# Altium PCB CellForge_PCB.PcbDoc (part 4 of 4)
Units mm, origin at the board's own origin, x right, y up, seen from the top; angles counter-clockwise.
Board outline 170.5 x 170.5 mm, 4 copper layers (Top Layer, Solid GND Plane, Power Distribution + signals, Bottom Layer), stack 1.586 mm thick; 199 components, 117 nets, 719 pads, 464 vias.
Unrouted connection lines stored in the file: 8.
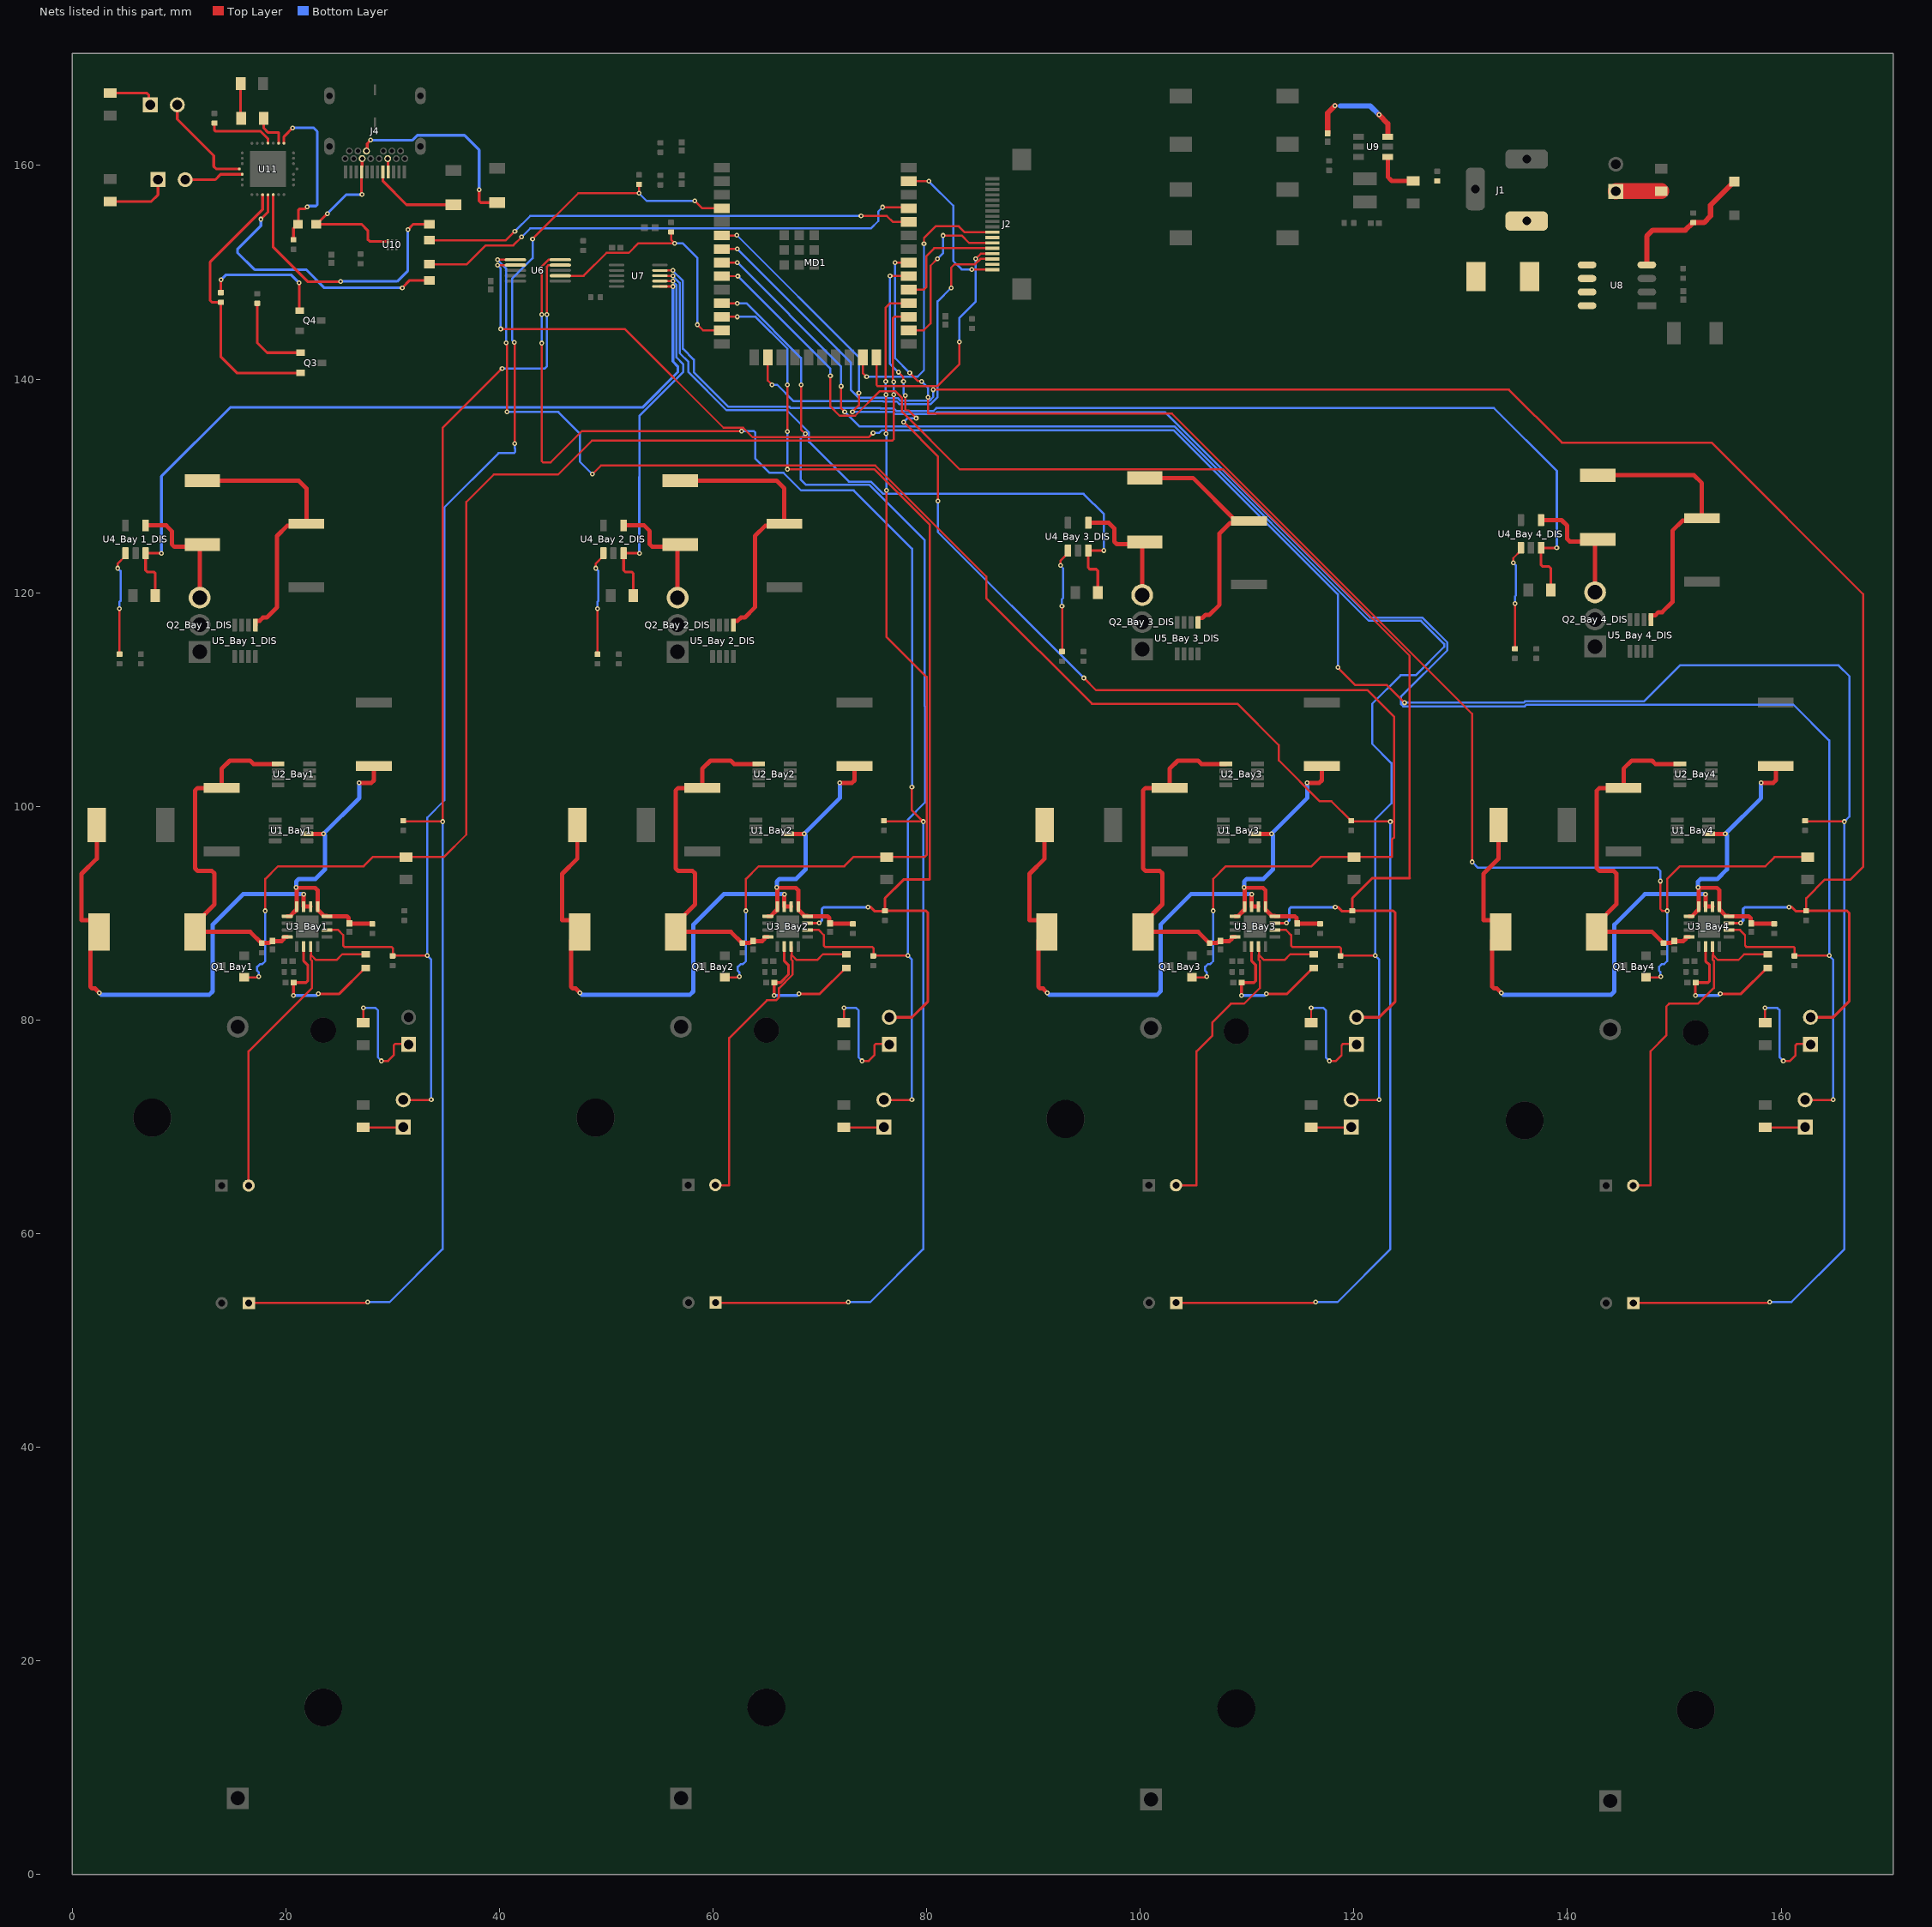
[diagram p5: the nets of this part, all layers, seen from the top]

## Via types
v1: diameter 0.45, hole 0.2, Top Layer to Bottom Layer, tented both sides, 464 vias

## Nets (pads, with @x,y where several pads share a name; then routed paths per layer and width w, separated by ;. In a path a pad name is that pad's centre, name@x,y a point inside that pad or via, vN(x,y) a via of type N, cw(c..) or ccw(c..) an arc to the next point about the centre after c; other vN are vias at no path point) (continued)
MCU_CHRG2: DS2_Bay2.2 MD1.12 R1_Bay2.2 U3_Bay2.15 | length 98.7
  Top Layer w0.2: MD1.12@60.825,145.83 v1(62.275,145.83) ; v1(66.975,131.575) 75.1,131.575 80.302,126.373 80.302,93.202 80.25,93.15 ; v1(66.975,135.1) v1(66.975,139.45)
  Top Layer w0.254: U3_Bay2.15@68.86,89.075 v1(69.95,89.075) ; v1(74.5,90.575) 74.75,90.575 75.15,90.175 76.05,90.175 R1_Bay2.2@76.1,90.225 ; DS2_Bay2.2@76.5,80.25 78.625,80.25 80.125,81.75 80.125,90.026 79.926,90.225 R1_Bay2.2@76.1,90.225 ; 80.25,93.15 77.85,93.15 76.1,91.4 R1_Bay2.2@76.1,90.225
  Bottom Layer w0.2: v1(62.275,145.83) 63.978,145.83 66.975,142.833 v1(66.975,139.45) ; v1(66.975,131.575) v1(66.975,135.1)
  Bottom Layer w0.254: v1(69.95,89.075) 70.2,89.325 70.2,90.401 70.349,90.55 74.475,90.55 v1(74.5,90.575)
MCU_CHRG3: DS2_Bay3.2 MD1.9 R1_Bay3.2 U3_Bay3.15 | length 137.3
  Top Layer w0.2: MD1.9@60.825,149.64 v1(62.325,149.64) ; v1(70.998,140.298) 70.998,137.428 71.851,136.575 73.305,136.575 75.607,138.877 77.06,138.877 77.7,138.237 77.7,136.951 83.094,131.557 107.763,131.557 125.225,114.094 125.225,93.275
  Top Layer w0.254: U3_Bay3.15@112.61,89.075 v1(113.7,89.075) ; v1(118.25,90.575) 118.5,90.575 118.9,90.175 119.8,90.175 R1_Bay3.2@119.85,90.225 ; DS2_Bay3.2@120.25,80.25 122.375,80.25 123.875,81.75 123.875,90.026 123.676,90.225 R1_Bay3.2@119.85,90.225 ; 125.225,93.275 121.725,93.275 119.85,91.4 R1_Bay3.2@119.85,90.225
  Bottom Layer w0.2: v1(62.325,149.64) 70.998,140.967 v1(70.998,140.298)
  Bottom Layer w0.254: v1(113.7,89.075) 113.95,89.325 113.95,90.401 114.099,90.55 118.225,90.55 v1(118.25,90.575)
MCU_CHRG4: DS2_Bay4.2 MD1.7 R1_Bay4.2 U3_Bay4.15 | length 181.5
  Top Layer w0.2: MD1.7@60.825,152.18 v1(62.275,152.18) ; v1(80.625,139.003) 134.522,139.003 139.475,134.05 153.5,134.05 167.675,119.875 167.675,94.325 166.5,93.15 164.1,93.15 162.35,91.4 R1_Bay4.2@162.35,90.225
  Top Layer w0.254: U3_Bay4.15@155.11,89.075 v1(156.2,89.075) ; v1(160.75,90.575) 161,90.575 161.4,90.175 162.3,90.175 R1_Bay4.2@162.35,90.225 166.176,90.225 166.375,90.026 166.375,81.75 164.875,80.25 DS2_Bay4.2@162.75,80.25
  Bottom Layer w0.2: v1(62.275,152.18) 72.898,141.557 72.898,138.99 73.619,138.269 76.019,138.269 76.065,138.223 77.307,138.223 77.557,137.973 80.26,137.973 80.625,138.338 v1(80.625,139.003)
  Bottom Layer w0.254: v1(156.2,89.075) 156.45,89.325 156.45,90.401 156.599,90.55 160.725,90.55 v1(160.75,90.575)
MCU_MODE_EN1: MD1.27 Q1_Bay1.1 R3_Bay1.1 | length 118.1
  Top Layer w0.2: Q1_Bay1.1@16.1,84 17.41,84 17.46,84.05 v1(17.475,84.05) ; v1(18.075,90.225) 18.075,93.2 19.273,94.398 27.285,94.398 28.137,95.25 R3_Bay1.1@31.25,95.25 34.8,95.25 36.9,97.35 36.9,128.5 39.475,131.075 45.5,131.075 48.673,134.248 76.781,134.248 76.925,134.392 v1(76.925,138.55) ; v1(76.925,139.75) 76.925,139.765 76.85,139.84 76.85,145.713 76.967,145.83 MD1.27@78.325,145.83
  Bottom Layer w0.2: v1(17.475,84.05) 17.465,84.06 17.465,84.475 17.325,84.615 17.325,84.975 17.595,85.245 17.807,85.245 18.077,85.515 18.077,90.223 v1(18.075,90.225) ; v1(76.925,138.55) v1(76.925,139.75)
MCU_MODE_EN2: MD1.28 Q1_Bay2.1 R3_Bay2.1 | length 84.1
  Top Layer w0.2: Q1_Bay2.1@61.1,84 62.41,84 62.46,84.05 v1(62.475,84.05) ; v1(63.075,90.225) 63.075,93.2 64.273,94.398 72.285,94.398 73.137,95.25 79.8,95.25 80.002,95.452 80.002,112.111 76.225,115.888 v1(76.225,129.575) ; v1(76.175,139.775) 76.175,146.7 76.575,147.1 MD1.28@78.325,147.1 ; v1(76.2,134.9) v1(76.2,138.55)
  Bottom Layer w0.2: v1(62.475,84.05) 62.465,84.06 62.465,84.475 62.325,84.615 62.325,84.975 62.595,85.245 62.807,85.245 63.077,85.515 63.077,90.223 v1(63.075,90.225) ; v1(76.175,139.775) 76.175,138.59 76.2,138.565 v1(76.2,138.55) ; v1(76.2,134.9) 76.2,134.885 76.225,134.86 v1(76.225,129.575)
MCU_MODE_EN3: MD1.30 Q1_Bay3.1 R3_Bay3.1 | length 120.9
  Top Layer w0.2: v1(76.575,149.65) 78.315,149.65 MD1.30@78.325,149.64 ; v1(77.35,140.65) 77.815,140.185 77.815,139.785 v1(77.825,139.775) ; v1(77.85,135.975) 81.05,132.775 v1(81.05,128.6) ; v1(78,138.45) 78,137.075 78.3,137.075 v1(79.025,136.35) ; v1(94.723,112.023) 95.871,110.875 121.286,110.875 123.752,108.409 123.752,97.081 123.55,96.879 123.55,95.25 116.887,95.25 116.035,94.398 108.023,94.398 106.825,93.2 v1(106.825,90.225) ; Q1_Bay3.1@104.85,84 106.16,84 106.21,84.05 v1(106.225,84.05)
  Bottom Layer w0.2: v1(76.575,149.65) 76.575,141.425 v1(77.35,140.65) ; v1(77.825,139.775) 77.825,138.64 78,138.465 v1(78,138.45) ; v1(77.85,135.975) 78.225,136.35 v1(79.025,136.35) ; v1(81.05,128.6) 81.05,125.696 v1(94.723,112.023) ; v1(106.225,84.05) 106.215,84.06 106.215,84.475 106.075,84.615 106.075,84.975 106.345,85.245 106.557,85.245 106.827,85.515 106.827,90.223 v1(106.825,90.225)
MCU_MODE_EN4: MD1.31 Q1_Bay4.1 R3_Bay4.1 | length 140.6
  Top Layer w0.2: v1(77.05,150.9) 78.315,150.9 MD1.31@78.325,150.91 ; v1(78.425,140.575) 79.19,139.81 79.515,139.81 v1(79.525,139.8) ; v1(80.125,138.3) 80.125,136.775 102.969,136.775 131.075,108.669 v1(131.075,94.8) ; Q1_Bay4.1@147.35,84 148.66,84 148.71,84.05 v1(148.725,84.05) ; v1(148.7,93) 148.7,90.4 148.875,90.225 v1(149.325,90.225) 149.325,93.2 150.523,94.398 158.535,94.398 159.387,95.25 R3_Bay4.1@162.5,95.25
  Bottom Layer w0.2: v1(77.05,150.9) 77.05,141.95 v1(78.425,140.575) ; v1(79.525,139.8) 80.125,139.2 v1(80.125,138.3) ; v1(131.075,94.8) 131.625,94.25 148.408,94.25 148.7,93.958 v1(148.7,93) ; v1(148.725,84.05) 148.715,84.06 148.715,84.475 148.575,84.615 148.575,84.975 148.845,85.245 149.057,85.245 149.327,85.515 149.327,90.223 v1(149.325,90.225)
MCU_STBY1: DS1_Bay1.2 MD1.4 R2_Bay1.2 R12.2 U3_Bay1.14 | length 120.9
  Top Layer w0.2: U3_Bay1.14@23.86,88.425 24.9,88.425 25.375,87.95 25.375,86.967 25.492,86.85 29.908,86.85 30.025,86.733 30.025,86.025 R2_Bay1.2@30,86 30.015,86.015 33.24,86.015 v1(33.25,86.025) ; DS1_Bay1.2@31,72.52 33.58,72.52 33.61,72.55 v1(33.625,72.55) ; v1(41.4,143.425) 41.4,143.41 41.425,143.385 v1(41.425,133.95) ; v1(43.1,153.125) 47.375,157.4 v1(53.075,157.4) R12.2@53.075,158.225 ; v1(58.3,156.675) 58.985,155.99 MD1.4@60.825,155.99
  Bottom Layer w0.2: v1(33.625,72.55) 33.625,85.65 v1(33.25,86.025) 33.25,98.962 34.85,100.562 34.85,128 39.925,133.075 41.358,133.075 41.475,133.192 41.475,133.485 41.435,133.525 41.435,133.94 v1(41.425,133.95) ; v1(41.4,143.425) 41.4,143.44 41.173,143.667 41.173,149.386 43.1,151.313 v1(43.1,153.125) ; v1(53.075,157.4) 53.8,156.675 v1(58.3,156.675)
MCU_STBY2: DS1_Bay2.2 MD1.11 R2_Bay2.2 U3_Bay2.14 | length 102.5
  Top Layer w0.2: MD1.11@60.825,147.1 v1(62.275,147.1) ; v1(68.245,139.45) 68.245,135.28 v1(68.65,134.875) ; U3_Bay2.14@68.86,88.425 69.9,88.425 70.375,87.95 70.375,86.967 70.492,86.85 74.908,86.85 75.025,86.733 75.025,86.025 R2_Bay2.2@75,86 75.015,86.015 78.24,86.015 v1(78.25,86.025) ; DS1_Bay2.2@76,72.52 78.58,72.52 78.61,72.55 v1(78.625,72.55)
  Bottom Layer w0.2: v1(62.275,147.1) 63.133,147.1 68.245,141.988 v1(68.245,139.45) ; v1(68.65,134.875) 68.2,134.425 68.2,130.6 68.7,130.1 74.65,130.1 79.825,124.925 79.825,109.4 79.85,109.375 79.85,100.37 78.25,98.77 v1(78.25,86.025) 78.625,85.65 v1(78.625,72.55)
MCU_STBY3: DS1_Bay3.2 MD1.8 R2_Bay3.2 U3_Bay3.14 | length 146.6
  Top Layer w0.2: MD1.8@60.825,150.91 v1(62.275,150.91) ; v1(72,139.325) 72,137.275 v1(72.325,136.95) ; U3_Bay3.14@112.61,88.425 113.65,88.425 114.125,87.95 114.125,86.967 114.242,86.85 118.658,86.85 118.775,86.733 118.775,86.025 R2_Bay3.2@118.75,86 ; R2_Bay3.2@118.765,86.015 121.99,86.015 v1(122,86.025) ; DS1_Bay3.2@119.75,72.52 122.33,72.52 122.36,72.55 v1(122.375,72.55)
  Bottom Layer w0.2: v1(62.275,150.91) 72,141.185 v1(72,139.325) ; v1(72.325,136.95) 73.722,135.553 103.225,135.553 121.398,117.381 126.282,117.381 128.452,115.21 128.452,114.94 125.787,112.275 124.388,112.275 121.723,109.61 121.723,105.846 123.517,104.052 123.517,100.287 122,98.77 v1(122,86.025) 122.375,85.65 v1(122.375,72.55)
MCU_STBY4: DS1_Bay4.2 MD1.6 R2_Bay4.2 U3_Bay4.14 | length 184.8
  Top Layer w0.2: MD1.6@60.825,153.45 62.185,153.45 62.21,153.475 v1(62.225,153.475) ; v1(73.05,136.95) 73.65,137.55 v1(73.65,138.7) ; U3_Bay4.14@155.11,88.425 156.15,88.425 156.625,87.95 156.625,86.967 156.742,86.85 161.158,86.85 161.275,86.733 161.275,86.025 R2_Bay4.2@161.25,86 161.265,86.015 164.49,86.015 v1(164.5,86.025) ; DS1_Bay4.2@162.25,72.52 164.83,72.52 164.86,72.55 v1(164.875,72.55)
  Bottom Layer w0.2: v1(62.225,153.475) 73.65,142.05 v1(73.65,138.7) ; v1(73.05,136.95) 76.807,136.95 77.038,136.719 80.78,136.719 80.961,136.9 102.303,136.9 121.522,117.681 126.406,117.681 128.752,115.335 128.752,114.614 124.423,110.285 124.423,109.565 124.615,109.373 135.992,109.373 136.148,109.529 161.144,109.529 164.5,106.173 v1(164.5,86.025) 164.875,85.65 v1(164.875,72.55)
NetC1_Bay1_1: C1_Bay1.1 C2_Bay1.1 R_SHUNT1_Bay1.2 U1_Bay1.2 U3_Bay1.1 U3_Bay1.4 U3_Bay1.5 U3_Bay1.16 | length 30.8
  Top Layer w0.4: U3_Bay1.5@20.14,89.725 20.405,89.725 20.985,90.305 21.025,90.345 U3_Bay1.4@21.025,90.61 21.025,92.35 v1(20.975,92.4) 21,92.375 22.741,92.375 22.975,92.141 U3_Bay1.1@22.975,90.61 22.975,90.345 23.555,89.765 23.82,89.765 U3_Bay1.16@23.86,89.725 25.716,89.725 25.88,89.561 25.88,89.11 C2_Bay1.1@25.95,89.04 25.97,89.02 28.08,89.02 C1_Bay1.1@28.1,89 ; U1_Bay1.2@21.975,97.425 23.4,97.425 v1(23.525,97.425) ; v1(26.875,102.225) 26.9,102.2 28.016,102.2 28.25,102.434 R_SHUNT1_Bay1.2@28.25,103.778
  Bottom Layer w0.4: v1(20.975,92.4) 20.975,92.966 21.209,93.2 22.775,93.2 23.675,94.1 23.675,97.275 v1(23.525,97.425) 26.875,100.775 v1(26.875,102.225)
NetC1_Bay2_1: C1_Bay2.1 C2_Bay2.1 R_SHUNT1_Bay2.2 U1_Bay2.2 U3_Bay2.1 U3_Bay2.4 U3_Bay2.5 U3_Bay2.16 | length 30.8
  Top Layer w0.4: U3_Bay2.5@65.14,89.725 65.405,89.725 65.985,90.305 66.025,90.345 U3_Bay2.4@66.025,90.61 66.025,92.35 v1(65.975,92.4) 66,92.375 67.741,92.375 67.975,92.141 U3_Bay2.1@67.975,90.61 67.975,90.345 68.555,89.765 68.82,89.765 U3_Bay2.16@68.86,89.725 70.716,89.725 70.88,89.561 70.88,89.11 C2_Bay2.1@70.95,89.04 70.97,89.02 73.08,89.02 C1_Bay2.1@73.1,89 ; U1_Bay2.2@66.975,97.425 68.4,97.425 v1(68.525,97.425) ; v1(71.875,102.225) 71.9,102.2 73.016,102.2 73.25,102.434 R_SHUNT1_Bay2.2@73.25,103.778
  Bottom Layer w0.4: v1(65.975,92.4) 65.975,92.966 66.209,93.2 67.775,93.2 68.675,94.1 68.675,97.275 v1(68.525,97.425) 71.875,100.775 v1(71.875,102.225)
NetC1_Bay3_1: C1_Bay3.1 C2_Bay3.1 R_SHUNT1_Bay3.2 U1_Bay3.2 U3_Bay3.1 U3_Bay3.4 U3_Bay3.5 U3_Bay3.16 | length 30.8
  Top Layer w0.4: U3_Bay3.5@108.89,89.725 109.155,89.725 109.735,90.305 109.775,90.345 U3_Bay3.4@109.775,90.61 109.775,92.35 v1(109.725,92.4) 109.75,92.375 111.491,92.375 111.725,92.141 U3_Bay3.1@111.725,90.61 111.725,90.345 112.305,89.765 112.57,89.765 U3_Bay3.16@112.61,89.725 114.466,89.725 114.63,89.561 114.63,89.11 C2_Bay3.1@114.7,89.04 114.72,89.02 116.83,89.02 C1_Bay3.1@116.85,89 ; U1_Bay3.2@110.725,97.425 112.15,97.425 v1(112.275,97.425) ; v1(115.625,102.225) 115.65,102.2 116.766,102.2 117,102.434 R_SHUNT1_Bay3.2@117,103.778
  Bottom Layer w0.4: v1(109.725,92.4) 109.725,92.966 109.959,93.2 111.525,93.2 112.425,94.1 112.425,97.275 v1(112.275,97.425) 115.625,100.775 v1(115.625,102.225)
NetC1_Bay4_1: C1_Bay4.1 C2_Bay4.1 R_SHUNT1_Bay4.2 U1_Bay4.2 U3_Bay4.1 U3_Bay4.4 U3_Bay4.5 U3_Bay4.16 | length 30.8
  Top Layer w0.4: U3_Bay4.5@151.39,89.725 151.655,89.725 152.235,90.305 152.275,90.345 U3_Bay4.4@152.275,90.61 152.275,92.35 v1(152.225,92.4) 152.25,92.375 153.991,92.375 154.225,92.141 154.225,90.61 154.225,90.345 154.805,89.765 155.07,89.765 U3_Bay4.16@155.11,89.725 156.966,89.725 157.13,89.561 157.13,89.11 C2_Bay4.1@157.2,89.04 157.22,89.02 159.33,89.02 C1_Bay4.1@159.35,89 ; U1_Bay4.2@153.225,97.425 154.65,97.425 v1(154.775,97.425) ; v1(158.125,102.225) 158.15,102.2 159.266,102.2 159.5,102.434 R_SHUNT1_Bay4.2@159.5,103.778
  Bottom Layer w0.4: v1(152.225,92.4) 152.225,92.966 152.459,93.2 154.025,93.2 154.925,94.1 154.925,97.275 v1(154.775,97.425) 158.125,100.775 v1(158.125,102.225)
NetC7_Bay1_1: C7_Bay1.1 R8_Bay1.1 U3_Bay1.10 | length 13.8
  Top Layer w0.254: v1(20.725,82.3) 20.725,83.475 C7_Bay1.1@20.75,83.5 21.901,83.5 22.052,83.651 22.052,85.147 21.675,85.524 U3_Bay1.10@21.675,86.89 ; v1(23.05,82.45) 25,82.45 27.4,84.85 R8_Bay1.1@27.5,84.85
  Bottom Layer w0.254: v1(20.725,82.3) 22.9,82.3 v1(23.05,82.45)
NetC7_Bay2_1: C7_Bay2.1 R8_Bay2.1 U3_Bay2.10 | length 13.5
  Top Layer w0.254: v1(65.725,82.3) 65.725,83.475 C7_Bay2.1@65.75,83.5 66.308,83.5 67.052,84.244 67.052,85.147 66.675,85.524 U3_Bay2.10@66.675,86.89 ; v1(68.05,82.45) 70,82.45 72.4,84.85 R8_Bay2.1@72.5,84.85
  Bottom Layer w0.254: v1(65.725,82.3) 67.9,82.3 v1(68.05,82.45)
NetC7_Bay3_1: C7_Bay3.1 R8_Bay3.1 U3_Bay3.10 | length 13.8
  Top Layer w0.254: v1(109.475,82.3) 109.475,83.475 C7_Bay3.1@109.5,83.5 110.651,83.5 110.802,83.651 110.802,85.147 110.425,85.524 U3_Bay3.10@110.425,86.89 ; v1(111.8,82.45) 113.75,82.45 116.15,84.85 R8_Bay3.1@116.25,84.85
  Bottom Layer w0.254: v1(109.475,82.3) 111.65,82.3 v1(111.8,82.45)
NetC7_Bay4_1: C7_Bay4.1 R8_Bay4.1 U3_Bay4.10 | length 13.8
  Top Layer w0.254: v1(151.975,82.3) 151.975,83.475 C7_Bay4.1@152,83.5 153.151,83.5 153.302,83.651 153.302,85.147 152.925,85.524 U3_Bay4.10@152.925,86.89 ; v1(154.3,82.45) 156.25,82.45 158.65,84.85 R8_Bay4.1@158.75,84.85
  Bottom Layer w0.254: v1(151.975,82.3) 154.15,82.3 v1(154.3,82.45)
NetC14_1: C14.1 U9.6 | length 9.2
  Top Layer w0.5: C14.1@117.55,163.005 117.55,164.915 v1(118.225,165.59) ; v1(122.35,164.75) 123.175,163.925 U9.6@123.175,162.7
  Bottom Layer w0.5: 118.725,165.575 121.525,165.575 v1(122.35,164.75)
NetD1_Bay1_1: D1_Bay1.1 L1_Bay1.1 U3_Bay1.2 U3_Bay1.3 | length 46.9
  Top Layer w0.4: D1_Bay1.1@2.295,98.25 2.295,95.095 0.875,93.675 0.875,89.35 1.7,89.35 2.5,88.55 L1_Bay1.1@2.5,88.25 1.7,87.45 1.7,86.424 1.7,83.126 1.876,82.95 2.15,82.95 v1(2.55,82.55) ; v1(21.675,91.775) U3_Bay1.3@21.675,90.61 U3_Bay1.2@22.325,90.61
  Bottom Layer w0.4: v1(2.55,82.55) 2.725,82.375 12.85,82.375 13.15,82.675 13.15,88.925 16,91.775 v1(21.675,91.775)
NetD1_Bay2_1: D1_Bay2.1 L1_Bay2.1 U3_Bay2.2 U3_Bay2.3 | length 46.9
  Top Layer w0.4: D1_Bay2.1@47.295,98.25 47.295,95.095 45.875,93.675 45.875,89.35 46.7,89.35 47.5,88.55 L1_Bay2.1@47.5,88.25 46.7,87.45 46.7,86.424 46.7,83.126 46.876,82.95 47.15,82.95 v1(47.55,82.55) ; v1(66.675,91.775) U3_Bay2.3@66.675,90.61 U3_Bay2.2@67.325,90.61
  Bottom Layer w0.4: v1(47.55,82.55) 47.725,82.375 57.85,82.375 58.15,82.675 58.15,88.925 61,91.775 v1(66.675,91.775)
NetD1_Bay3_1: D1_Bay3.1 L1_Bay3.1 U3_Bay3.2 U3_Bay3.3 | length 46.9
  Top Layer w0.4: D1_Bay3.1@91.045,98.25 91.045,95.095 89.625,93.675 89.625,89.35 90.45,89.35 91.25,88.55 L1_Bay3.1@91.25,88.25 90.45,87.45 90.45,86.424 90.45,83.126 90.626,82.95 90.9,82.95 v1(91.3,82.55) ; v1(110.425,91.775) U3_Bay3.3@110.425,90.61 U3_Bay3.2@111.075,90.61
  Bottom Layer w0.4: v1(91.3,82.55) 91.475,82.375 101.6,82.375 101.9,82.675 101.9,88.925 104.75,91.775 v1(110.425,91.775)
NetD1_Bay4_1: D1_Bay4.1 L1_Bay4.1 U3_Bay4.2 U3_Bay4.3 | length 46.9
  Top Layer w0.4: D1_Bay4.1@133.545,98.25 133.545,95.095 132.125,93.675 132.125,89.35 132.95,89.35 133.75,88.55 L1_Bay4.1@133.75,88.25 132.95,87.45 132.95,86.424 132.95,83.126 133.126,82.95 133.4,82.95 v1(133.8,82.55) ; v1(152.925,91.775) U3_Bay4.3@152.925,90.61 U3_Bay4.2@153.575,90.61
  Bottom Layer w0.4: v1(133.8,82.55) 133.975,82.375 144.1,82.375 144.4,82.675 144.4,88.925 147.25,91.775 v1(152.925,91.775)
NetD3_2: D3.2 R25.1 U8.4 | length 13.6
  Top Layer w0.5: U8.4@147.425,150.69 147.425,153.382 147.986,153.943 151.043,153.943 151.75,154.65 R25.1@151.775,154.65 152.775,154.65 153.4,155.275 153.4,156.275 155.4,158.275 155.4,158.3 155.6,158.5 D3.2@155.625,158.5
NetDS1_Bay1_1: DS1_Bay1.1 R4_Bay1.2 | length 3.8
  Top Layer w0.2: R4_Bay1.2@27.25,69.95 30.97,69.95 DS1_Bay1.1@31,69.98
NetDS1_Bay2_1: DS1_Bay2.1 R4_Bay2.2 | length 3.8
  Top Layer w0.2: R4_Bay2.2@72.25,69.95 75.97,69.95 DS1_Bay2.1@76,69.98
NetDS1_Bay3_1: DS1_Bay3.1 R4_Bay3.2 | length 3.8
  Top Layer w0.2: R4_Bay3.2@116,69.95 119.72,69.95 DS1_Bay3.1@119.75,69.98
NetDS1_Bay4_1: DS1_Bay4.1 R4_Bay4.2 | length 3.8
  Top Layer w0.2: R4_Bay4.2@158.5,69.95 162.22,69.95 DS1_Bay4.1@162.25,69.98
NetDS2_Bay1_1: DS2_Bay1.1 R5_Bay1.2 | length 11.5
  Top Layer w0.2: R5_Bay1.2@27.25,79.75 v1(27.25,81.125) ; v1(28.95,76.175) 29.575,76.175 30.1,76.7 30.1,77.633 30.217,77.75 31.46,77.75 DS2_Bay1.1@31.5,77.71
  Bottom Layer w0.2: v1(27.25,81.125) 28.4,81.125 28.625,80.9 28.625,76.5 v1(28.95,76.175)
NetDS2_Bay2_1: DS2_Bay2.1 R5_Bay2.2 | length 11.5
  Top Layer w0.2: R5_Bay2.2@72.25,79.75 v1(72.25,81.125) ; v1(73.95,76.175) 74.575,76.175 75.1,76.7 75.1,77.633 75.217,77.75 76.46,77.75 DS2_Bay2.1@76.5,77.71
  Bottom Layer w0.2: v1(72.25,81.125) 73.4,81.125 73.625,80.9 73.625,76.5 v1(73.95,76.175)
NetDS2_Bay3_1: DS2_Bay3.1 R5_Bay3.2 | length 11.5
  Top Layer w0.2: R5_Bay3.2@116,79.75 v1(116,81.125) ; v1(117.7,76.175) 118.325,76.175 118.85,76.7 118.85,77.633 118.967,77.75 120.21,77.75 DS2_Bay3.1@120.25,77.71
  Bottom Layer w0.2: v1(116,81.125) 117.15,81.125 117.375,80.9 117.375,76.5 v1(117.7,76.175)
NetDS2_Bay4_1: DS2_Bay4.1 R5_Bay4.2 | length 11.5
  Top Layer w0.2: R5_Bay4.2@158.5,79.75 v1(158.5,81.125) ; v1(160.2,76.175) 160.825,76.175 161.35,76.7 161.35,77.633 161.467,77.75 162.71,77.75 DS2_Bay4.1@162.75,77.71
  Bottom Layer w0.2: v1(158.5,81.125) 159.65,81.125 159.875,80.9 159.875,76.5 v1(160.2,76.175)
NetDS3_1: DS3.1 R23.2 | length 4.3
  Top Layer w1.5: DS3.1@144.525,157.58 144.545,157.6 R23.2@148.775,157.6
NetDS5_1: DS5.1 R30.2 | length 4.7
  Top Layer w0.254: R30.2@3.575,166.775 7,166.775 7.175,166.6 7.175,165.805 DS5.1@7.305,165.675
NetDS5_2: DS5.2 U11.18 | length 9.7
  Top Layer w0.254: DS5.2@9.845,165.675 9.845,164.33 13.25,160.925 13.25,159.904 13.479,159.675 U11.18@15.65,159.675
NetDS6_1: DS6.1 R31.2 | length 6.1
  Top Layer w0.254: R31.2@3.575,156.625 7.4,156.625 8.035,157.26 DS6.1@8.035,158.675
NetDS6_2: DS6.2 U11.19 | length 5.6
  Top Layer w0.254: DS6.2@10.575,158.675 13.4,158.675 13.9,159.175 U11.19@15.925,159.175
NetF1_1: F1.1 J1.1
NetF1_2: F1.2 U8.5 U8.6 U8.7 U8.8
NetJ2_1: J2.1 MD1.37 | length 14.3
  Top Layer w0.2: MD1.37@78.325,158.53 78.33,158.525 v1(80.2,158.525) ; v1(84.225,150.275) 84.235,150.265 86.135,150.265 J2.1@86.15,150.25
  Bottom Layer w0.2: v1(80.2,158.525) 82.5,156.225 82.5,151.05 83.275,150.275 v1(84.225,150.275)
NetJ2_3: J2.3 MD1.16 | length 36.1
  Top Layer w0.2: MD1.16@65.135,142.04 65.135,139.865 v1(65.525,139.475) ; v1(82.3,148.55) 82.3,150.433 82.617,150.75 84.537,150.75 85.037,151.25 J2.3@86.15,151.25
  Bottom Layer w0.2: v1(65.525,139.475) 66,139.475 67.544,137.931 75.932,137.931 75.959,137.904 77.202,137.904 77.433,137.673 80.385,137.673 81.025,138.313 81.025,147.275 v1(82.3,148.55)
NetJ2_4: J2.4 MD1.24 | length 23.5
  Top Layer w0.2: MD1.24@75.295,142.04 75.295,139.467 75.412,139.35 81.025,139.35 83.075,141.4 v1(83.075,143.475) ; v1(84.6,151.275) 85.075,151.75 J2.4@86.15,151.75
  Bottom Layer w0.2: v1(83.075,143.475) 83.075,145.738 84.6,147.263 v1(84.6,151.275)
NetJ2_5: J2.5 MD1.29 | length 11.1
  Top Layer w0.2: MD1.29@78.325,148.37 79.72,148.37 79.975,148.625 79.975,151.525 80.7,152.25 J2.5@86.15,152.25
NetJ2_6: J2.6 MD1.26 | length 15.9
  Top Layer w0.2: MD1.26@78.325,144.56 79.715,144.56 80.375,145.22 80.375,150.625 v1(81.025,151.275) ; v1(81.525,153.45) 83.275,153.45 83.975,152.75 J2.6@86.15,152.75
  Bottom Layer w0.2: v1(81.025,151.275) 81.525,151.775 v1(81.525,153.45)
NetJ2_8: J2.8 MD1.23 | length 27
  Top Layer w0.2: MD1.23@74.025,142.04 74.025,140.575 v1(74.375,140.225) ; v1(79.75,152.675) 79.75,153.2 80.85,154.3 83.012,154.3 83.562,153.75 J2.8@86.15,153.75
  Bottom Layer w0.2: v1(74.375,140.225) 79.15,140.225 79.75,140.825 v1(79.75,152.675)
NetJ4_A5: J4.A5 R32.2 | length 8.4
  Top Layer w0.254: J4.A5@29.095,159.395 29.095,158.53 31.3,156.325 R32.2@35.7,156.325
NetJ4_B5: J4.B5 R33.2 | length 18.6
  Top Layer w0.254: J4.B5@27.545,161.345 27.621,161.421 27.621,162.046 v1(27.95,162.375) ; v1(38.1,157.725) 38.1,156.675 38.25,156.525 R33.2@39.775,156.525
  Bottom Layer w0.254: v1(27.95,162.375) 31.867,162.375 32.314,162.822 36.728,162.822 38.1,161.45 v1(38.1,157.725)
"NetQ2_Bay 1_DIS_3": "Q2_Bay 1_DIS.3" "R15_Bay 1_DIS.1" "U4_Bay 1_DIS.4" | length 12
  Top Layer w0.4: 6.881,126.3 8.8,126.3 9.325,125.775 9.325,124.534 9.559,124.3 11.978,124.3 12.181,124.503 11.931,124.253 11.931,119.54
"NetQ2_Bay 2_DIS_3": "Q2_Bay 2_DIS.3" "R15_Bay 2_DIS.1" "U4_Bay 2_DIS.4" | length 12
  Top Layer w0.4: 51.631,126.3 53.55,126.3 54.075,125.775 54.075,124.534 54.309,124.3 56.728,124.3 56.931,124.503 56.681,124.253 56.681,119.54
"NetQ2_Bay 3_DIS_3": "Q2_Bay 3_DIS.3" "R15_Bay 3_DIS.1" "U4_Bay 3_DIS.4" | length 12
  Top Layer w0.4: 95.131,126.55 97.05,126.55 97.575,126.025 97.575,124.784 97.809,124.55 100.228,124.55 100.431,124.753 100.181,124.503 100.181,119.79
"NetQ2_Bay 4_DIS_3": "Q2_Bay 4_DIS.3" "R15_Bay 4_DIS.1" "U4_Bay 4_DIS.4" | length 12
  Top Layer w0.4: 137.531,126.8 139.45,126.8 139.975,126.275 139.975,125.034 140.209,124.8 142.628,124.8 142.831,125.003 142.581,124.753 142.581,120.04
NetQ3_1: Q3.1 R28.2 | length 8.1
  Top Layer w0.254: R28.2@17.325,147.1 17.325,143.4 18.25,142.475 Q3.1@21.365,142.475
NetQ4_1: Q4.1 R29.2 | length 11.6
  Top Layer w0.254: R29.2@13.925,148.1 v1(13.925,149.3) ; v1(21.25,149.025) 21.25,146.465 Q4.1@21.29,146.425
  Bottom Layer w0.254: v1(13.925,149.3) 14.375,149.75 20.525,149.75 v1(21.25,149.025)
NetR7_Bay1_2: R7_Bay1.2 R8_Bay1.2 U3_Bay1.11 | length 30.5
  Top Layer w0.2: R7_Bay1.2@16.52,64.5 16.52,77.07 22.45,83 22.45,85.535 22.325,85.66 22.325,86.085 ; U3_Bay1.11@22.325,86.89 22.365,86.85 22.365,86.085 22.827,85.623 24.756,85.623 25.283,86.15 R8_Bay1.2@27.5,86.15
NetR7_Bay2_2: R7_Bay2.2 R8_Bay2.2 U3_Bay2.11 | length 32.3
  Top Layer w0.2: R7_Bay2.2@60.22,64.55 60.27,64.5 61.52,64.5 61.52,78.32 65.05,81.85 65.911,81.85 66.175,82.114 66.175,82.975 67.45,84.25 67.45,85.535 67.325,85.66 67.325,86.085 ; U3_Bay2.11@67.325,86.89 67.365,86.85 67.365,86.085 67.827,85.623 69.756,85.623 70.283,86.15 R8_Bay2.2@72.5,86.15
NetR7_Bay3_2: R7_Bay3.2 R8_Bay3.2 U3_Bay3.11 | length 33.1
  Top Layer w0.2: R7_Bay3.2@103.345,64.525 103.37,64.5 105.27,64.5 105.27,77.07 106.753,78.553 106.753,79.778 108.493,81.518 109.718,81.518 111.2,83 111.2,85.535 111.075,85.66 111.075,86.085 ; U3_Bay3.11@111.075,86.89 111.115,86.85 111.115,86.085 111.577,85.623 113.506,85.623 114.033,86.15 R8_Bay3.2@116.25,86.15
NetR7_Bay4_2: R7_Bay4.2 R8_Bay4.2 U3_Bay4.11 | length 33.7
  Top Layer w0.2: R7_Bay4.2@146.145,64.5 147.77,64.5 147.77,77.07 149.253,78.553 149.253,81.253 149.518,81.518 152.217,81.518 153.7,83 153.7,85.535 153.575,85.66 153.575,86.085 ; U3_Bay4.11@153.575,86.89 153.615,86.85 153.615,86.085 154.077,85.623 156.006,85.623 156.533,86.15 R8_Bay4.2@158.75,86.15
"NetR15_Bay 1_DIS_2": "R15_Bay 1_DIS.2" "R17_Bay 1_DIS.1" "U5_Bay 1_DIS.1" | length 26.2
  Top Layer w0.4: 12.181,130.497 21.203,130.497 21.931,129.769 21.931,126.472 21.723,126.264 20.131,126.264 19.173,125.306 19.173,118.632 18.216,117.675 17.856,117.675 17.556,117.375 17.181,117.375 17.156,117.35 17.156,116.975
"NetR15_Bay 2_DIS_2": "R15_Bay 2_DIS.2" "R17_Bay 2_DIS.1" "U5_Bay 2_DIS.1" | length 26.2
  Top Layer w0.4: 56.931,130.497 65.953,130.497 66.681,129.769 66.681,126.472 66.473,126.264 64.881,126.264 63.923,125.306 63.923,118.632 62.966,117.675 62.606,117.675 62.306,117.375 61.931,117.375 61.906,117.35 61.906,116.975
"NetR15_Bay 3_DIS_2": "R15_Bay 3_DIS.2" "R17_Bay 3_DIS.1" "U5_Bay 3_DIS.1" | length 24.3
  Top Layer w0.4: 100.431,130.747 104.937,130.747 108.962,126.722 110.181,126.722 109.973,126.514 108.381,126.514 107.423,125.556 107.423,118.882 106.466,117.925 106.106,117.925 105.806,117.625 105.431,117.625 105.406,117.6 105.406,117.225
"NetR15_Bay 4_DIS_2": "R15_Bay 4_DIS.2" "R17_Bay 4_DIS.1" "U5_Bay 4_DIS.1" | length 26.2
  Top Layer w0.4: 142.831,130.997 151.853,130.997 152.581,130.269 152.581,126.972 152.373,126.764 150.781,126.764 149.823,125.806 149.823,119.132 148.866,118.175 148.506,118.175 148.206,117.875 147.831,117.875 147.806,117.85 147.806,117.475
"NetR16_Bay 1_DIS_1": "R16_Bay 1_DIS.1" "U4_Bay 1_DIS.1" | length 9.9
  Top Layer w0.2: v1(4.275,122.3) 4.275,122.744 4.981,123.45 4.981,123.7 ; v1(4.425,118.5) 4.428,118.497 4.428,114.253 4.431,114.25
  Bottom Layer w0.2: v1(4.275,122.3) 4.275,122.285 4.527,122.033 4.527,119.251 4.425,119.149 v1(4.425,118.5)
"NetR16_Bay 2_DIS_1": "R16_Bay 2_DIS.1" "U4_Bay 2_DIS.1" | length 9.9
  Top Layer w0.2: v1(49.025,122.3) 49.025,122.744 49.731,123.45 49.731,123.7 ; v1(49.175,118.5) 49.178,118.497 49.178,114.253 49.181,114.25
  Bottom Layer w0.2: v1(49.025,122.3) 49.025,122.285 49.277,122.033 49.277,119.251 49.175,119.149 v1(49.175,118.5)
"NetR16_Bay 3_DIS_1": "R16_Bay 3_DIS.1" "U4_Bay 3_DIS.1" | length 9.9
  Top Layer w0.2: v1(92.525,122.55) 92.525,122.994 93.231,123.7 93.231,123.95 ; v1(92.675,118.75) 92.678,118.747 92.678,114.503 92.681,114.5
  Bottom Layer w0.2: v1(92.525,122.55) 92.525,122.535 92.777,122.283 92.777,119.501 92.675,119.399 v1(92.675,118.75)
"NetR16_Bay 4_DIS_1": "R16_Bay 4_DIS.1" "U4_Bay 4_DIS.1" | length 9.9
  Top Layer w0.2: v1(134.925,122.8) 134.925,123.244 135.631,123.95 135.631,124.2 ; v1(135.075,119) 135.078,118.997 135.078,114.753 135.081,114.75
  Bottom Layer w0.2: v1(134.925,122.8) 134.925,122.785 135.177,122.533 135.177,119.751 135.075,119.649 v1(135.075,119)
NetR22_2: R22.2 R24.1 U9.4 | length 4.4
  Top Layer w0.4: U9.4@123.175,160.8 123.175,158.925 123.426,158.674 123.55,158.55 R22.2@125.55,158.55
NetR34_1: R34.1 U11.11 | length 6.4
  Top Layer w0.254: R34.1@13.325,163.975 13.325,163.304 13.429,163.2 17.65,163.2 18.325,162.525 U11.11@18.325,162.091
NetR35_1: R35.1 R36.1 U11.8 | length 16
  Top Layer w0.254: U11.8@19.825,162.075 19.825,162.7 v1(20.65,163.525) ; R36.1@20.725,153.05 20.725,154.125 21.175,154.575 21.175,155.801 21.324,155.95 21.825,155.95 v1(22,156.125)
  Bottom Layer w0.254: v1(20.65,163.525) 22.6,163.525 22.95,163.175 22.95,156.325 22.825,156.2 22.075,156.2 v1(22,156.125)
NetR37_1: R37.1 R38.1 | length 3.3
  Top Layer w0.254: R38.1@15.775,167.675 15.775,164.475 R37.1@15.825,164.425
NetR37_2: R37.2 U11.9 | length 3.5
  Top Layer w0.254: R37.2@17.925,164.425 17.925,163.5 18.325,163.1 19.325,163.1 U11.9@19.325,162.075
opIN_1: "R13_Bay 1_DIS.1" "U4_Bay 1_DIS.3" U7.6 | length 75.2
  Top Layer w0.254: 7.781,119.75 7.781,121.801 7.632,121.95 7.024,121.95 6.875,122.099 6.875,123.694 6.881,123.7 v1(8.35,123.7) ; U7.6@55.025,148.675 v1(56.25,148.675)
  Bottom Layer w0.254: v1(8.35,123.7) 8.35,130.9 14.8,137.35 53.4,137.35 56.7,140.65 56.7,141.2 56.25,141.65 v1(56.25,148.675)
opIN_2: "R13_Bay 2_DIS.1" "U4_Bay 2_DIS.3" U7.7 | length 34.9
  Top Layer w0.2: U7.7@55.025,149.175 v1(56.25,149.175)
  Top Layer w0.254: 52.531,119.75 52.531,121.801 52.382,121.95 51.774,121.95 51.625,122.099 51.625,123.694 51.631,123.7 v1(53.1,123.7)
  Bottom Layer w0.2: 53.1,130.863 53.1,136.55 57.2,140.65 57.2,141.407 56.577,142.03 56.577,148.81 56.25,149.137 v1(56.25,149.175)
  Bottom Layer w0.254: v1(53.1,123.7) 53.1,130.863
opIN_3: "R13_Bay 3_DIS.1" "U4_Bay 3_DIS.3" U7.8 | length 65.3
  Top Layer w0.2: U7.8@55.025,149.675 v1(56.25,149.675)
  Top Layer w0.254: 96.031,120 96.031,122.051 95.882,122.2 95.274,122.2 95.125,122.349 95.125,123.944 95.131,123.95 v1(96.6,123.95)
  Bottom Layer w0.2: v1(56.25,149.675) 56.25,149.637 56.877,149.01 56.877,142.437 57.7,141.614 57.7,140.65 61.252,137.098 66.889,137.098 68.977,135.01 68.977,134.136 72.713,130.4 74.774,130.4 75.926,129.248 94.698,129.248 96.6,127.346 v1(96.6,123.95)
opIN_4: "R13_Bay 4_DIS.1" "U4_Bay 4_DIS.3" U7.9 | length 109.8
  Top Layer w0.2: U7.9@55.025,150.175 v1(56.25,150.175)
  Top Layer w0.254: 138.431,120.25 138.431,122.301 138.282,122.45 137.674,122.45 137.525,122.599 137.525,124.194 137.531,124.2 v1(139,124.2)
  Bottom Layer w0.2: v1(56.25,150.175) 56.25,150.137 57.177,149.21 57.177,142.844 58.2,141.821 58.2,140.65 61.452,137.398 67.152,137.398 67.273,137.277 75.661,137.277 75.688,137.25 76.931,137.25 77.162,137.019 80.656,137.019 80.914,137.277 133.123,137.277 139,131.4
  Bottom Layer w0.254: v1(139,124.2) 139,131.4
RTS: Q3.2 R29.1 U11.24 | length 26.2
  Top Layer w0.254: U11.24@17.825,157.259 17.825,155.875 12.925,150.975 12.925,147.35 13.075,147.2 R29.1@13.925,147.2 13.925,142.075 15.425,140.575 Q3.2@21.365,140.575
RXD: R26.2 U11.25 | length 26.2
  Top Layer w0.254: v1(17.675,154.975) 18.325,155.625 U11.25@18.325,157.259 ; v1(30.9,148.55) 31.6,149.25 R26.2@33.45,149.25
  Bottom Layer w0.254: v1(17.675,154.975) 17.675,154.35 15.475,152.15 15.475,151.85 17.075,150.25 21.9,150.25 23.6,148.55 v1(30.9,148.55)
RXD0_UART: MD1.34 R27.1 | length 46.1
  Top Layer w0.2: R27.1@33.45,153 40.6,153 v1(41.45,153.85) ; v1(73.85,155.275) 76.275,155.275 76.85,154.7 78.305,154.7 MD1.34@78.325,154.72
  Bottom Layer w0.2: v1(41.45,153.85) 42.875,155.275 v1(73.85,155.275)
SCRN_SDCS: J2.2
SCRN_SPI_MISO: J2.7
THERM_ADC1: R6_Bay1.2 R9_Bay1.1 U6.4 | length 123.6
  Top Layer w0.2: R9_Bay1.1@16.54,53.5 27.56,53.5 27.66,53.6 v1(27.675,53.6) ; R6_Bay1.2@31,98.65 31.065,98.585 34.665,98.585 v1(34.675,98.575) 34.675,135.425 v1(40.25,141) ; v1(44.45,146.05) 44.45,150.525 44.6,150.675 U6.4@45.7,150.675
  Bottom Layer w0.2: v1(27.675,53.6) 29.725,53.6 34.675,58.55 v1(34.675,98.575) ; v1(40.25,141) 44.25,141 44.45,141.2 v1(44.45,146.05)
THERM_ADC2: R6_Bay2.2 R9_Bay2.1 U6.5 | length 153.4
  Top Layer w0.2: v1(43.95,143.375) 43.95,132.35 44.1,132.2 44.8,132.2 47.725,135.125 v1(62.675,135.125) ; v1(43.95,146.05) 43.95,150.525 44.6,151.175 U6.5@45.7,151.175 ; R9_Bay2.1@60.24,53.55 60.29,53.5 72.56,53.5 72.66,53.6 v1(72.675,53.6) ; R6_Bay2.2@76,98.65 76.065,98.585 79.665,98.585 v1(79.675,98.575) 78.625,99.625 v1(78.625,101.825)
  Bottom Layer w0.2: v1(43.95,143.375) v1(43.95,146.05) ; v1(62.675,135.125) 63.833,135.125 63.95,135.008 63.95,132.575 65.3,131.225 66.6,131.225 68.25,129.575 73.175,129.575 78.627,124.123 78.627,101.827 v1(78.625,101.825) ; v1(72.675,53.6) 74.725,53.6 79.675,58.55 v1(79.675,98.575)
THERM_ADC3: R6_Bay3.2 R9_Bay3.1 U6.6 | length 181.3
  Top Layer w0.2: v1(39.825,151.175) U6.6@41.5,151.175 ; v1(40.625,143.4) 40.625,143.385 40.725,143.285 v1(40.725,136.925) ; v1(48.7,131.1) 49.502,131.902 75.197,131.902 85.58,121.52 85.58,119.506 95.484,109.602 109.097,109.602 112.971,105.729 112.971,104.314 116.817,100.467 117.908,100.467 119.725,98.65 R6_Bay3.2@119.75,98.65 119.815,98.585 123.415,98.585 v1(123.425,98.575) ; R9_Bay3.1@103.365,53.525 103.39,53.5 116.31,53.5 116.41,53.6 v1(116.425,53.6)
  Bottom Layer w0.2: v1(39.825,151.175) 40.625,150.375 v1(40.625,143.4) ; v1(40.725,136.925) 45.512,136.925 47.525,134.912 47.525,132.275 v1(48.7,131.1) ; v1(116.425,53.6) 118.475,53.6 123.425,58.55 v1(123.425,98.575)
THERM_ADC4: R6_Bay4.2 R9_Bay4.1 U6.7 | length 234.4
  Top Layer w0.2: v1(39.825,150.675) U6.7@41.5,150.675 ; v1(40.125,144.7) 51.738,144.7 60.986,135.452 62.81,135.452 63.714,134.548 74.573,134.548 v1(74.975,134.95) ; v1(118.5,113) 120.15,111.35 123.1,111.35 v1(124.75,109.7) ; R9_Bay4.1@146.165,53.5 158.81,53.5 158.91,53.6 v1(158.925,53.6) ; R6_Bay4.2@162.25,98.65 162.315,98.585 165.915,98.585 v1(165.925,98.575)
  Bottom Layer w0.2: v1(39.825,150.675) 40.125,150.375 v1(40.125,144.7) ; v1(74.975,134.95) 75.524,134.95 75.801,135.227 103.127,135.227 118.5,119.854 v1(118.5,113) ; v1(124.75,109.7) 135.895,109.7 136.024,109.829 147.154,109.829 150.525,113.2 165.383,113.2 166.4,112.183 166.4,99.05 v1(165.925,98.575) 165.925,58.55 160.975,53.6 v1(158.925,53.6)
THERM_ADC_RDY: MD1.13 R20.2 U6.2 | length 24.6
  Top Layer w0.2: U6.2@45.7,149.675 47.888,149.675 50.043,151.83 52.121,151.83 53.016,152.725 v1(56.4,152.725) 56.075,153.05 R20.2@56.075,153.775 ; v1(58.525,145.1) 59.065,144.56 MD1.13@60.825,144.56
  Bottom Layer w0.2: v1(56.4,152.725) 57.152,152.725 58.525,151.352 v1(58.525,145.1)
TXD: R27.2 U11.26 | length 25.4
  Top Layer w0.254: U11.26@18.825,157.275 18.825,152.35 22.05,149.125 25.1,149.125 v1(25.125,149.15) ; v1(31.425,154) 31.925,154.5 R27.2@33.45,154.5
  Bottom Layer w0.254: v1(25.125,149.15) 30.425,149.15 31.425,150.15 v1(31.425,154)
TXD0_UART: MD1.35 R26.1 | length 47.7
  Top Layer w0.2: R26.1@33.45,150.75 36.95,150.75 38.725,152.525 41.3,152.525 v1(42.075,153.3) ; v1(75.875,156.1) 78.215,156.1 MD1.35@78.325,155.99
  Bottom Layer w0.2: v1(42.075,153.3) 42.877,154.102 74.777,154.102 75.475,154.8 75.475,155.7 v1(75.875,156.1)
VBUS: J4.A4 J4.A9 J4.B4 J4.B9 R35.2 U10.6 | length 18
  Top Layer w0.254: v1(23.875,155.475) 22.9,154.5 R35.2@22.85,154.5 27.1,154.5 27.675,153.925 27.675,153.075 27.85,152.9 U10.6@29.55,152.9 ; v1(27.125,157.275) 27.095,157.305 J4.A9@27.095,159.395 27.095,159.845 27.145,159.895 J4.B4@27.145,160.645 ; J4.B9@29.545,160.645 29.572,160.618 29.572,159.418 J4.A4@29.595,159.395
  Bottom Layer w0.254: v1(23.875,155.475) 25.675,157.275 v1(27.125,157.275)
VS_PIN_Bay1: C5_Bay1.1 C6_Bay1.1 L1_Bay1.2 RS1_Bay1.1 U2_Bay1.1 U3_Bay1.8 | length 35
  Top Layer w0.4: U2_Bay1.1@19.275,103.975 16.972,103.975 16.662,104.284 14.759,104.284 14,103.525 RS1_Bay1.1@14,101.722 11.734,101.722 11.5,101.488 11.5,94.2 11.75,93.95 13.091,93.95 13.325,93.716 13.325,90.825 11.5,89 L1_Bay1.2@11.5,88.25 16.675,88.25 17.725,87.2 C5_Bay1.1@17.75,87.2 18.446,87.2 18.546,87.3 18.68,87.3 18.75,87.37 C6_Bay1.1@18.75,87.39 19.601,87.39 19.835,87.624 19.835,87.735 19.875,87.775 U3_Bay1.8@20.14,87.775
VS_PIN_Bay2: C5_Bay2.1 C6_Bay2.1 L1_Bay2.2 RS1_Bay2.1 U2_Bay2.1 U3_Bay2.8 | length 35
  Top Layer w0.4: U2_Bay2.1@64.275,103.975 61.972,103.975 61.662,104.284 59.759,104.284 59,103.525 RS1_Bay2.1@59,101.722 56.734,101.722 56.5,101.488 56.5,94.2 56.75,93.95 58.091,93.95 58.325,93.716 58.325,90.825 56.5,89 L1_Bay2.2@56.5,88.25 61.675,88.25 62.725,87.2 C5_Bay2.1@62.75,87.2 63.446,87.2 63.546,87.3 63.68,87.3 63.75,87.37 C6_Bay2.1@63.75,87.39 64.601,87.39 64.835,87.624 64.835,87.735 64.875,87.775 U3_Bay2.8@65.14,87.775
VS_PIN_Bay3: C5_Bay3.1 C6_Bay3.1 L1_Bay3.2 RS1_Bay3.1 U2_Bay3.1 U3_Bay3.8 | length 35
  Top Layer w0.4: U2_Bay3.1@108.025,103.975 105.722,103.975 105.412,104.284 103.509,104.284 102.75,103.525 RS1_Bay3.1@102.75,101.722 100.484,101.722 100.25,101.488 100.25,94.2 100.5,93.95 101.841,93.95 102.075,93.716 102.075,90.825 100.25,89 L1_Bay3.2@100.25,88.25 105.425,88.25 106.475,87.2 C5_Bay3.1@106.5,87.2 107.196,87.2 107.296,87.3 107.43,87.3 107.5,87.37 C6_Bay3.1@107.5,87.39 108.351,87.39 108.585,87.624 108.585,87.735 108.625,87.775 U3_Bay3.8@108.89,87.775
VS_PIN_Bay4: C5_Bay4.1 C6_Bay4.1 L1_Bay4.2 RS1_Bay4.1 U2_Bay4.1 U3_Bay4.8 | length 35
  Top Layer w0.4: U2_Bay4.1@150.525,103.975 148.222,103.975 147.912,104.284 146.009,104.284 145.25,103.525 RS1_Bay4.1@145.25,101.722 142.984,101.722 142.75,101.488 142.75,94.2 143,93.95 144.341,93.95 144.575,93.716 144.575,90.825 142.75,89 L1_Bay4.2@142.75,88.25 147.925,88.25 148.975,87.2 C5_Bay4.1@149,87.2 149.696,87.2 149.796,87.3 149.93,87.3 150,87.37 C6_Bay4.1@150,87.39 150.851,87.39 151.085,87.624 151.085,87.735 151.125,87.775 U3_Bay4.8@151.39,87.775
pads on no net: J1.3 J2.10 J2.12 J2.13 J2.14 J2.15 J2.16 J2.17 J2.18 J3_Bay_holder1. J3_Bay_holder2. J3_Bay_holder3. J3_Bay_holder4. J4.A2 J4.A3 J4.A8 J4.A10 J4.A11 J4.B2 J4.B3 J4.B8 J4.B10 J4.B11 MD1.5 MD1.14 MD1.17 MD1.18 MD1.19 MD1.20 MD1.21 MD1.22 MD1.32 U3_Bay1.6 U3_Bay2.6 U3_Bay3.6 U3_Bay4.6 U11.1 U11.2 U11.10 U11.12 U11.13 U11.14 U11.15 U11.16 U11.17 U11.20 U11.21 U11.22 U11.23 U11.27

## Polygon pours and split planes (outlines as drawn)
+12 on Top Layer "+12_L01_P003" (solid, pour order 3): 145.775,150.225 145.775,146 150.175,146 150.175,150.225
NetF1_1 on Top Layer "NETF1_1_L01_P001" (solid, pour order 1): 130.075,151.4 130.1,151.425 131.425,151.425 131.425,153.3 132,153.875 134.375,156.25 139.6,156.25 139.6,152.975 132.975,152.975 132.975,147.65 130.075,147.65
NetF1_2 on Top Layer "NETF1_2_L01_P000" (solid, pour order 0): 137.9,151.625 137.825,151.55 137.825,147.9 140.425,147.9 140.475,147.95 140.475,151.625 143.575,151.625 143.575,145.95 140.5,145.95 140.5,147.75 134.7,147.75 134.7,151.625
+12 on Power Distribution + signals "+12_L03_P008" (solid, pour order 8): 158.275,127.896 158.275,110.425 156.25,110.425 156.75,110.925 156.55,129.4
3V3 on Power Distribution + signals "3V3_L03_P004" (solid, pour order 4): 128.725,156.402 128.725,155.215 128.725,151.775 131.875,151.775 154.575,129.075 154.575,110.925 1.1,110.925 1.1,95.975 168.975,95.975 168.975,82.5 0.75,82.5 0.75,168.937
+12 on Power Distribution + signals "+12_L03_P007" (solid, pour order 7): 6.475,110.453 6.475,96.525 162.325,96.525 168.8,103 168.8,110.424
3V3 on Power Distribution + signals "3V3_L03_P005" (solid, pour order 5): 2.5,161.675 2.55,161.725 4.75,161.725 4.75,158.3 4.675,158.225 2.5,158.225
+12 on Power Distribution + signals "+12_L03_P002" (solid, pour order 2): 117.6,157.625 129.875,157.625 129.875,152.3 133.65,152.3 158.25,127.7 158.25,167.975 117.725,167.975 117.6,168.1
GND on Solid GND Plane (split plane): 169.99,0.51 0.51,0.51 0.51,169.99 169.99,169.99

## Silkscreen, mask and mechanical layers (free items; w line width, h text height)
Top Overlay:
  text "CellForge" at 142.704,166.575 h3

## Text inside footprints (layer, text, board x,y; h text height)
DS2_Bay1: Top Overlay "+" at 32.262,74.662 h1.5 r90
DS2_Bay2: Top Overlay "+" at 77.262,74.662 h1.5 r90
DS2_Bay3: Top Overlay "+" at 121.012,74.662 h1.5 r90
DS2_Bay4: Top Overlay "+" at 163.512,74.662 h1.5 r90
DS6: Top Overlay "+" at 4.987,157.913 h1.5
J4: Assembly Notes "PCB Edge" at 30.045,170.925 h0.61 r180
U8: Top Assembly "RefDes2" at 146.847,149.42 h1.27 r180
U9: Top Assembly "RefDes2" at 119.578,161.115 h1.27; Top Assembly "*" at 120.987,161.928 h1.27